# Altium PCB tmds62levm-j15-copper-keepout.PcbDoc
Units mm, origin at the board's own origin, x right, y up, seen from the top; angles counter-clockwise.
Board outline 6.6 x 6.6 mm, 2 copper layers (Top, Bottom), stack 0 mm thick; 1 components, 1 nets, 1 pads, 0 vias.
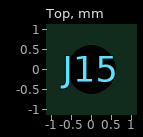
[diagram p0: Top view]
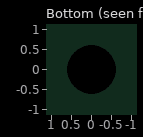
[diagram p1: Bottom view, seen from below]

## Layer stack, top to bottom

## Board outline
-3.302,-3.302 3.302,-3.302 3.302,3.302 -3.302,3.302

## Design rules (kind name [scope] priority, off if disabled: settings)
Clearance "" [All] p0: gap=0.102

## Components (designator, comment, footprint, x,y, rotation, side; value= is the part's Value field where it differs from the comment)
J15 "" ? 0,0 r0 top

## Footprints (in the part's own frame and the unit in brackets; to place one, negate y for a bottom-side part, rotate by r counter-clockwise, add the part's x,y. Pads: shape width x height; smd on the part's side, far side on the other; paste and mask are expansions set on the pad)
? [mil]
  round 43 hole 48 unplated mask+5.5: ""(0,0)

## Nets (pads, with @x,y where several pads share a name; then routed paths per layer and width w, separated by ;. In a path a pad name is that pad's centre, name@x,y a point inside that pad or via, vN(x,y) a via of type N, cw(c..) or ccw(c..) an arc to the next point about the centre after c; other vN are vias at no path point)
GND: 
pads on no net: J15.

## Polygon pours and split planes (outlines as drawn)
GND on Top (solid): -2.997,-2.997 2.997,-2.997 2.997,2.997 -2.997,2.997
GND on Bottom (solid): -2.997,-2.997 2.997,-2.997 2.997,2.997 -2.997,2.997